# Altium PCB imu_proj_3.PcbDoc
Units mm, origin at the board's own origin, x right, y up, seen from the top; angles counter-clockwise.
Board outline 45.65 x 48 mm, 4 copper layers (Top Layer, GND1, GND2, Bottom Layer), stack 0.783 mm thick; 59 components, 46 nets, 248 pads, 82 vias.
Unrouted connection lines stored in the file: 17.
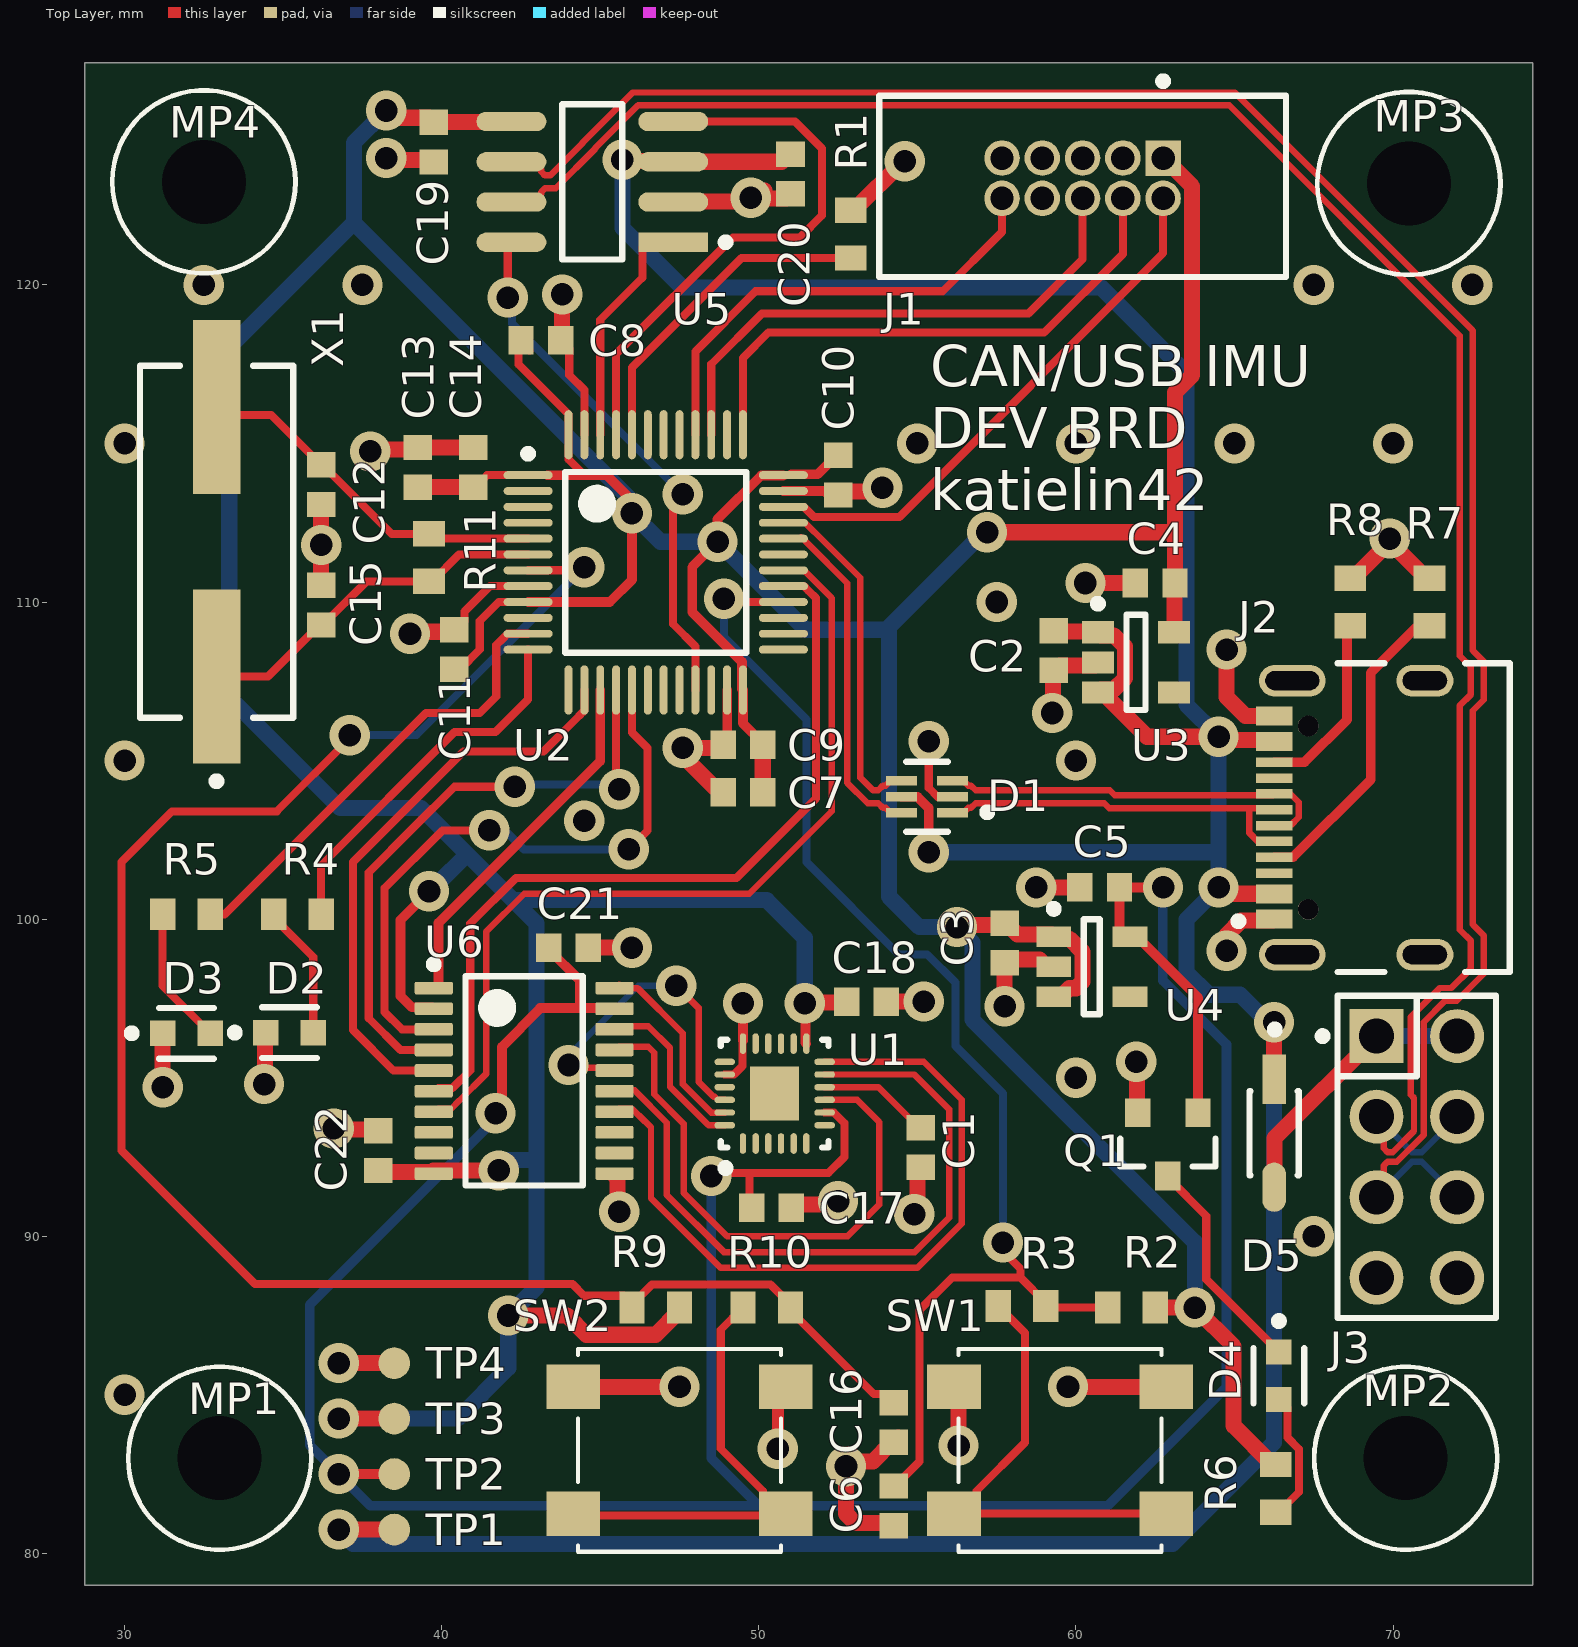
[diagram p0: Top Layer view]
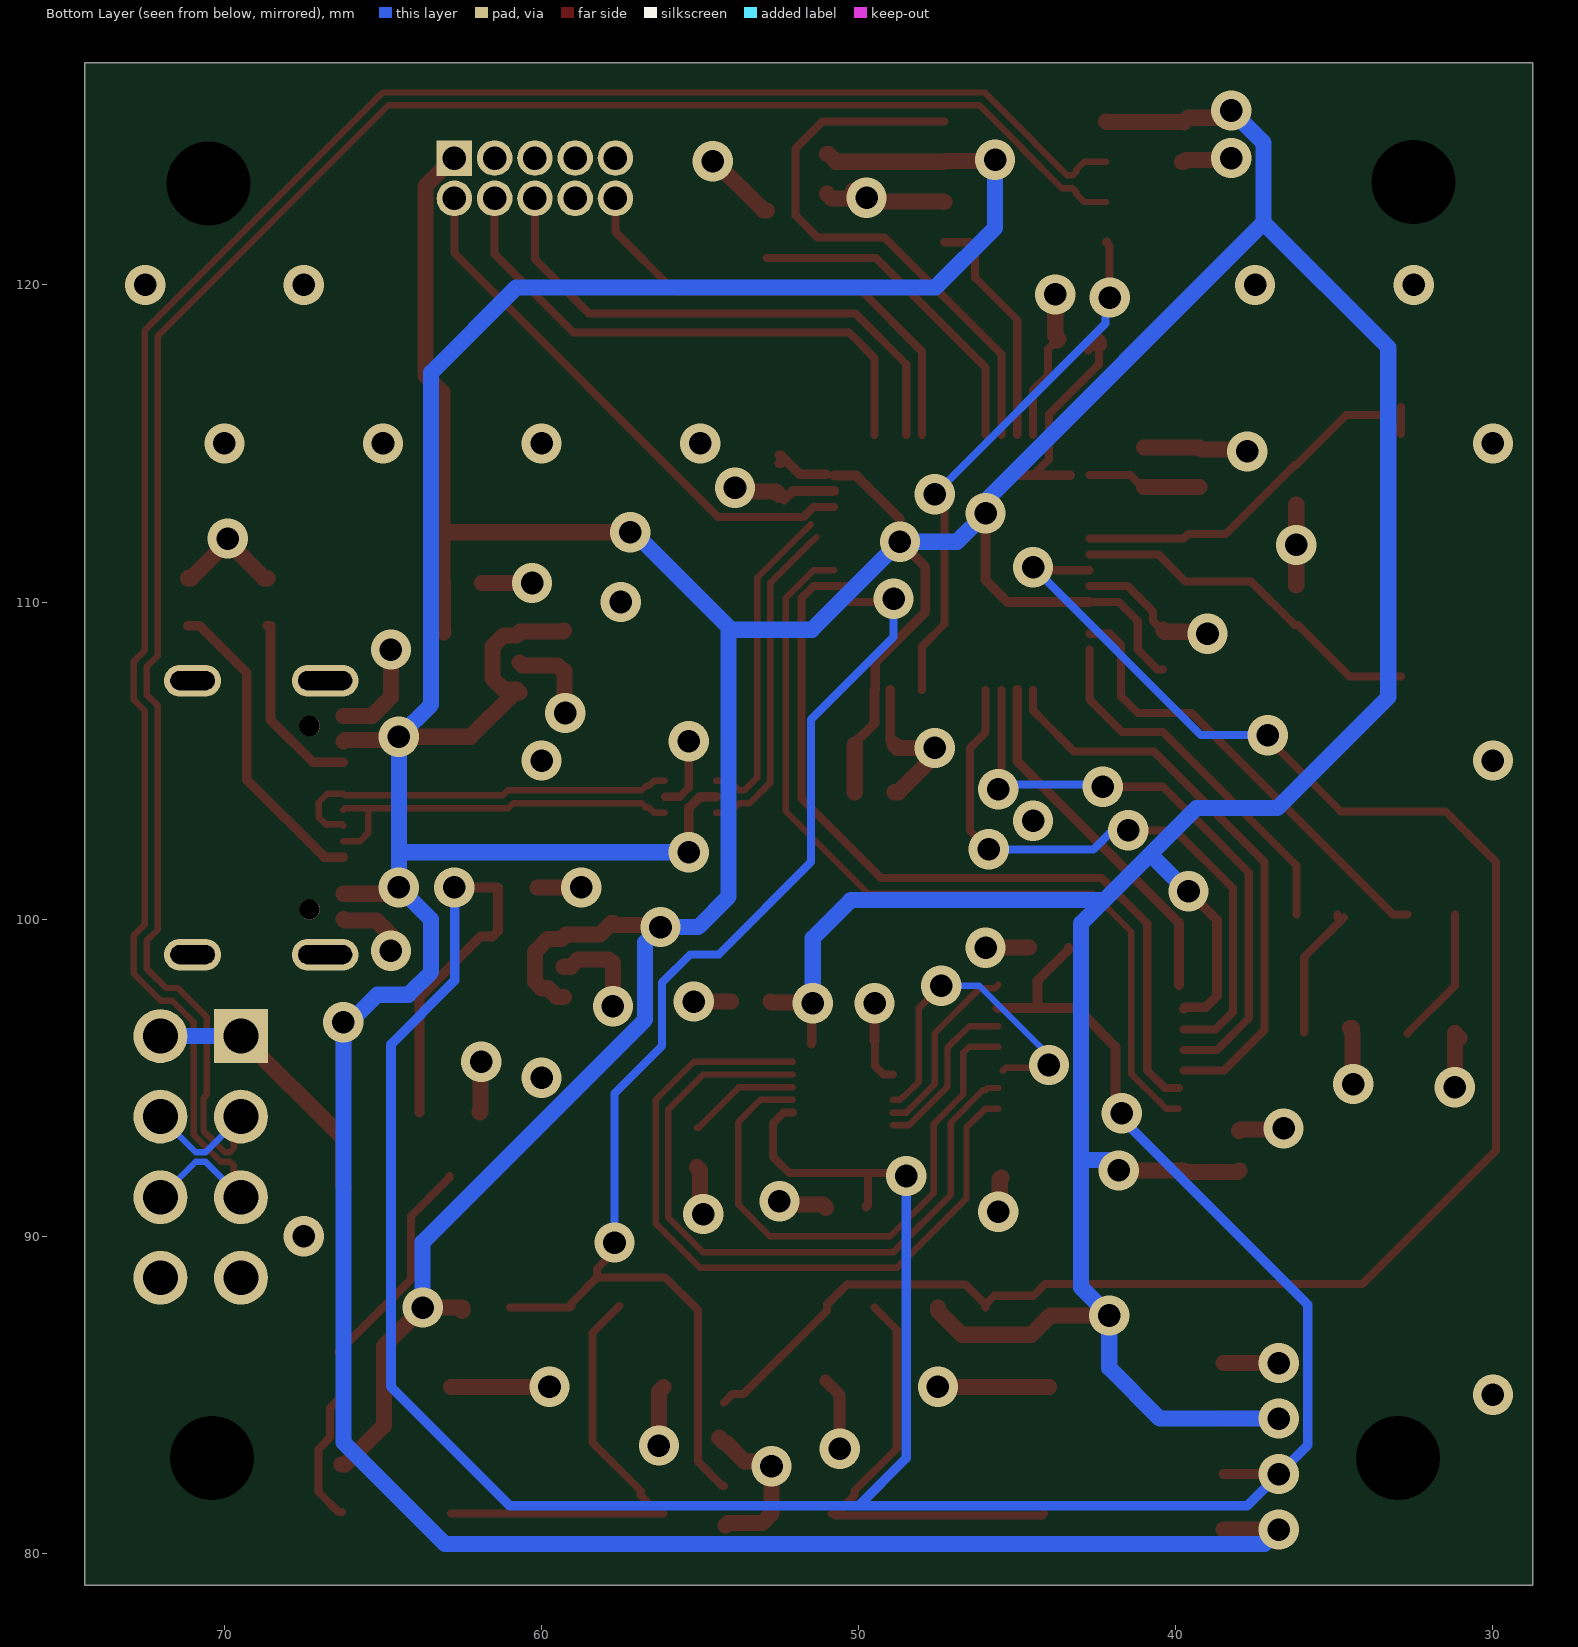
[diagram p1: Bottom Layer view, seen from below]
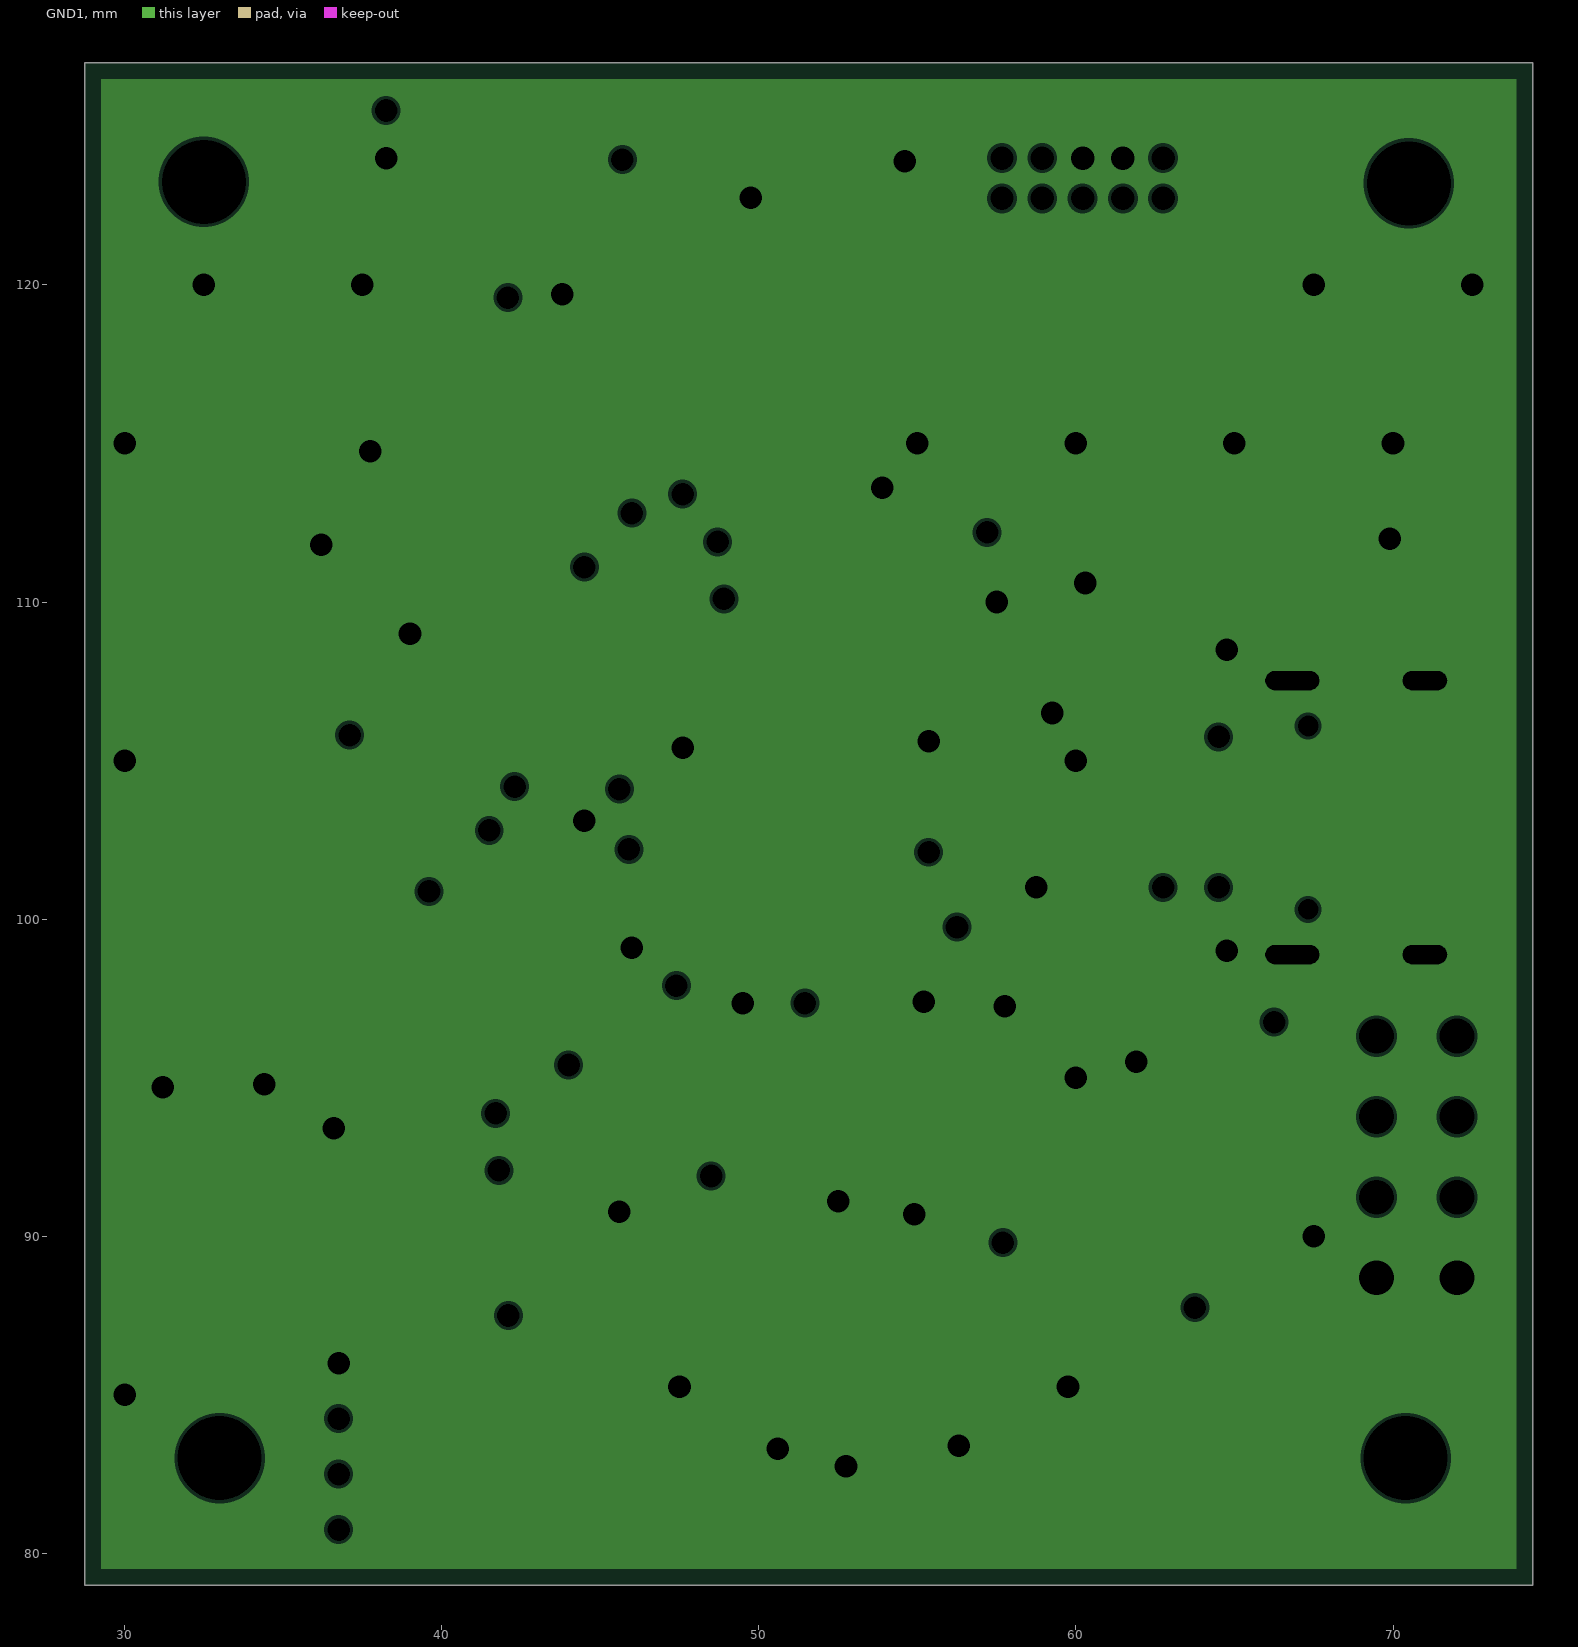
[diagram p2: GND1, clearances drawn from the general rule]
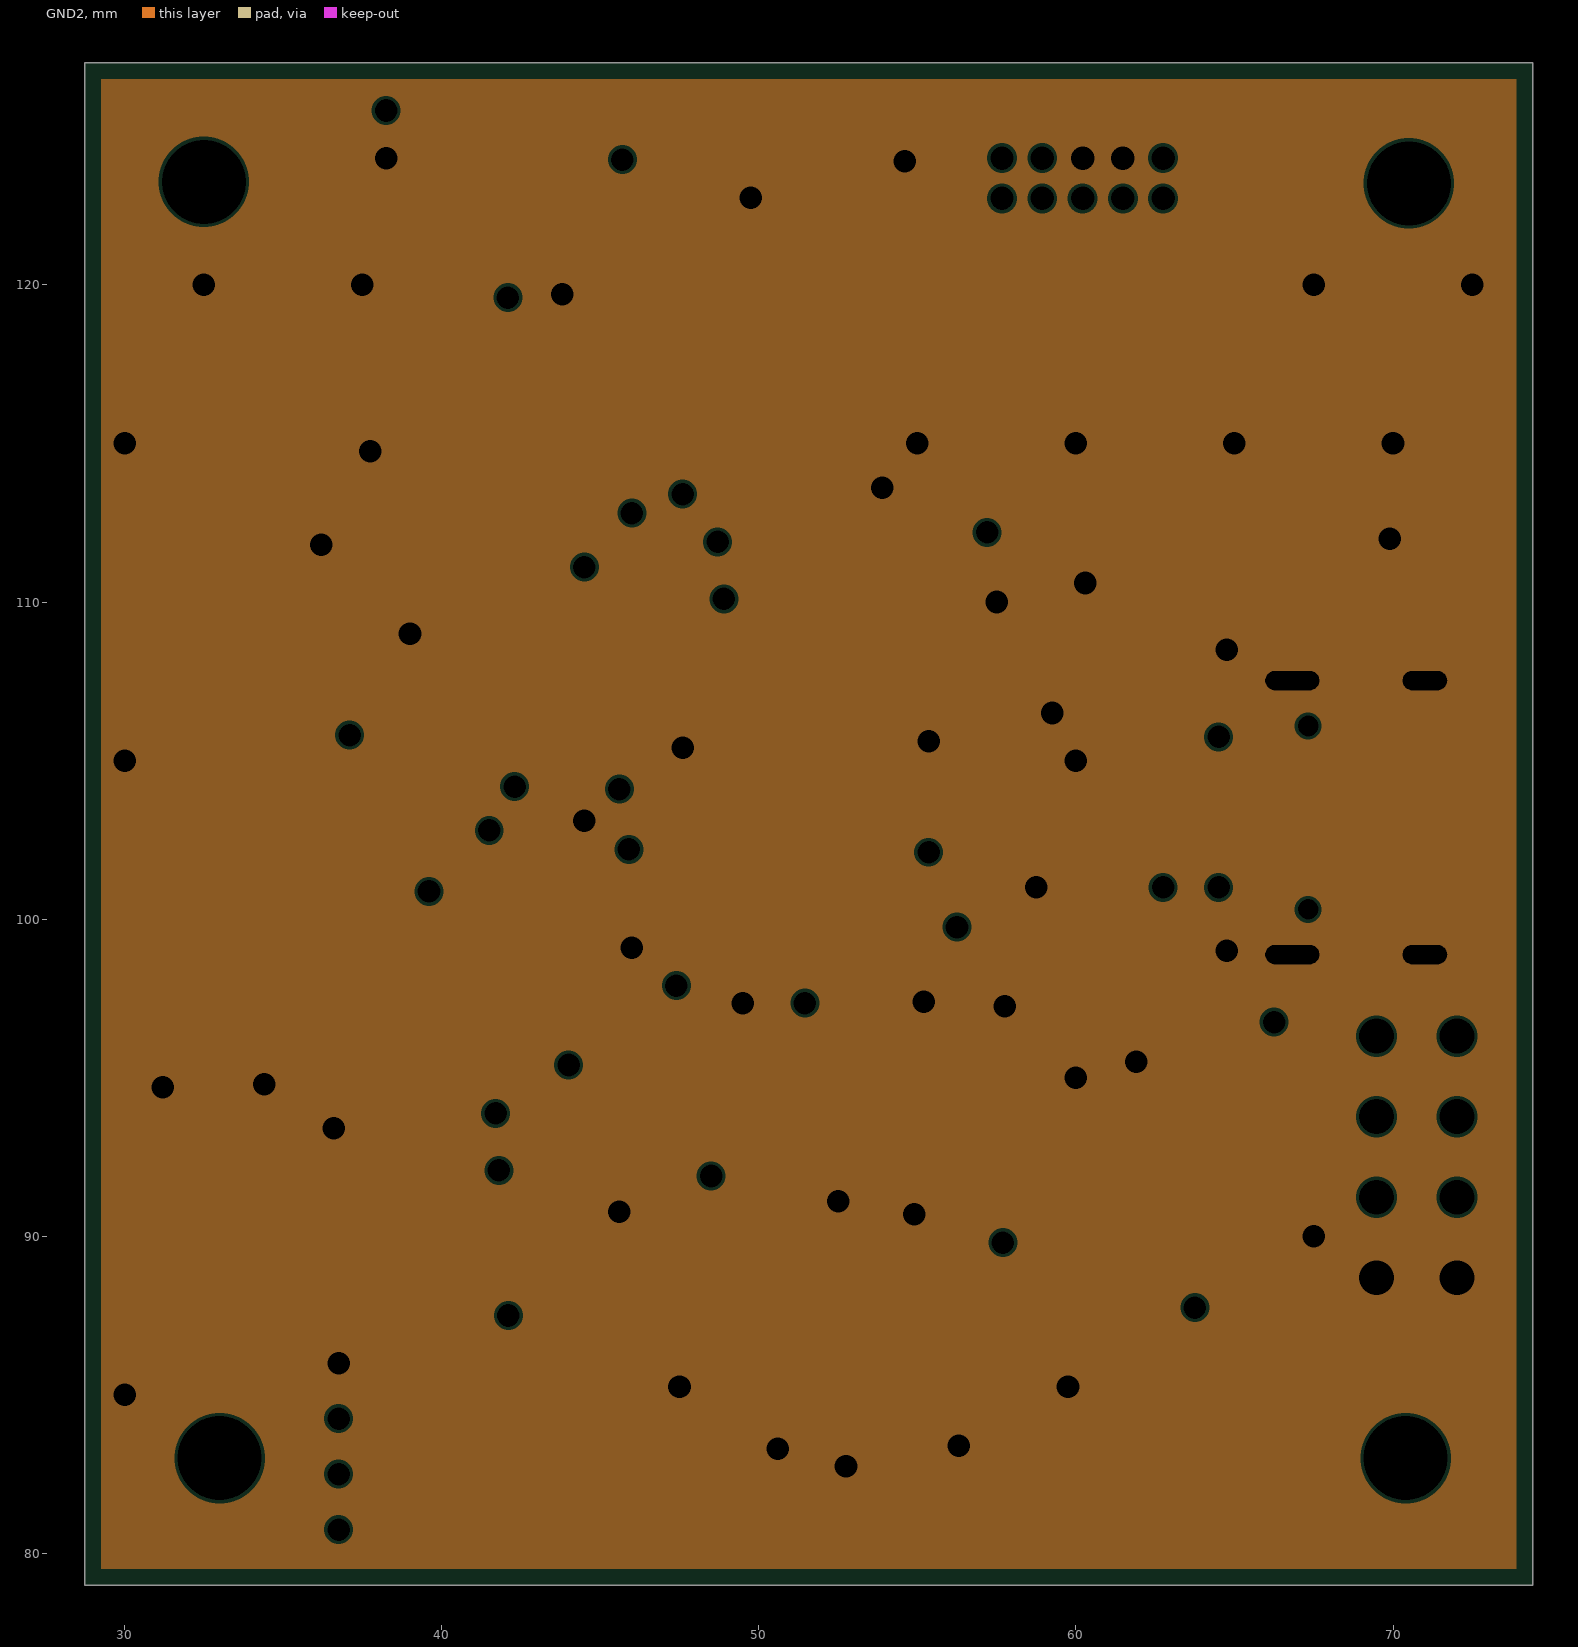
[diagram p3: GND2, clearances drawn from the general rule]

## Layer stack, top to bottom
Top Solder: solder mask 0.0102, Solder Resist, Dk 3.5
Top Layer: signal copper 0.0356
Dielectric 2: prepreg 0.0711, PP-006, Dk 4.1
GND1: plane copper 0.035, net GND
Dielectric 1: core 0.5, Core-009, Dk 4.5
GND2: plane copper 0.035, net GND
Dielectric 3: prepreg 0.0711, PP-006, Dk 4.1
Bottom Layer: signal copper 0.0356
Bottom Solder: solder mask 0.0102, Solder Resist, Dk 3.5

## Board outline
28.75,79 74.4,79 74.4,127 28.75,127

## Design rules (kind name [scope] priority, off if disabled: settings)
BoardOutlineClearance [All] p1: gap=0.2 ignorepadtopadclearanceinfootprint=FALSE
Clearance [All] p1: gap=0.102 ignorepadtopadclearanceinfootprint=TRUE except(0.127: Arc-Via Track-Via SMDPad-Via THPad-Via Via-Via Via-Fill Via-Poly Via-Region Via-Text; 0.25: Arc-Hole Track-Hole SMDPad-Hole THPad-Hole Via-Hole Fill-Hole Poly-Hole Region-Hole Text-Hole)
ComponentClearance [All] p1: gap=0.102 collisioncheckmode=3 verticalgap=0.102 showdistances=TRUE
DiffPairsRouting [All] p1: maxlimit=0.203 minlimit=0.102 mostfreqgap=0.203 toplayer_minwidth=0.102 toplayer_maxwidth=1816.048 toplayer_prefwidth=0.203 bottomlayer_maxgap=0.102 bottomlayer_prefgap=0.102 bottomlayer_minwidth=0.102 bottomlayer_maxwidth=1816.048 bottomlayer_prefwidth=0.102 maxuncoupledlength=12.7
Height [All] p1: minheight=0 maxheight=1816.048 prefheight=12.7
HoleSize [All] p1: absolutevalues=TRUE maxlimit=6.3 minlimit=0.2 maxpercent=80.000 minpercent=20.000
HoleToHoleClearance [All] p1: gap=0.25 allowstackedmicrovias=FALSE
MinimumAnnularRing [All] p1: minimumring=0.076
MinimumSolderMaskSliver [All] p1: minsoldermaskwidth=0
PlaneClearance [All] p1: clearance=0.102
PlaneConnect PlaneConnectPowerPads [InPadClass('PowerPads')] p1: planeconnectstyle=Direct reliefexpansion=0.508 reliefentries=4 reliefconductorwidth=0.254 reliefairgap=0.254
PlaneConnect [All] p2: pad.planeconnectstyle=Relief pad.reliefexpansion=0.3 pad.reliefentries=4 pad.reliefconductorwidth=0.102 pad.reliefairgap=0.102 via.planeconnectstyle=Direct via.reliefexpansion=0.3 via.reliefentries=4 via.reliefconductorwidth=0.127 via.reliefairgap=0.127
PolygonConnect PolygonConnectPowerPads [All vs (InPadClass('PowerPads'))] p1: connectstyle=Direct reliefconductorwidth=0.254 reliefentries=4 polygonreliefangle="90 Angle" airgapwidth=0.254
PolygonConnect [All] p2: thpad.connectstyle=Relief thpad.reliefconductorwidth=0.102 thpad.reliefentries=4 thpad.polygonreliefangle="90 Angle" thpad.airgapwidth=0.102 smdpad.connectstyle=Relief smdpad.reliefconductorwidth=0.102 smdpad.reliefentries=4 smdpad.polygonreliefangle="90 Angle" smdpad.airgapwidth=0.102 via.connectstyle=Direct via.reliefconductorwidth=0.127 via.reliefentries=4 via.polygonreliefangle="90 Angle" via.airgapwidth=0.127
RoutingVias [All] p1: holewidth=0.2 width=0.45 viastyle="Through Hole" minholewidth=0.2 minwidth=0.45 maxholewidth=6.3 maxwidth=6.55
SilkToSilkClearance [All] p1: silktosilkclearance=0
SilkToSolderMaskClearance [IsPad] p1: minsilkscreentomaskgap=0.102 clearancetoexposedcopper=TRUE
SolderMaskExpansion [All] p1: expansion=0.075
UnRoutedNet [All] p1: checkbadconnections=TRUE
Width [All] p1: maxlimit=1816.048 minlimit=0.102 preferedwidth=0.102
19 further rules are at their usual default settings.

## Components (designator, comment, footprint, x,y, rotation, side; value= is the part's Value field where it differs from the comment)
C1 "0.1µF" CAPC1608X87X35LL15T15 55.1,92.8 r90 top
C2 "1µF" CAPC1608X87X35LL15T15 59.296,108.471 r90 top
C3 "10µF" CAPC1608X87X35LL15T15 57.75,99.25 r90 top
C4 "1µF" CAPC1608X87X35LL15T15 62.5,110.6 r0 top
C5 "1µF" CAPC1608X87X35LL15T15 60.75,101 r0 top
C6 "0.1µF" CAPC1608X87X35LL15T15 54.25,81.5 r90 top
C7 "0.1µF" CAPC1608X87X35LL15T15 49.5,104 r0 top
C8 "0.1µF" CAPC1608X87X35LL15T15 43.125,118.25 r180 top
C9 "0.1µF" CAPC1608X87X35LL15T15 49.5,105.5 r0 top
C10 "0.1µF" CAPC1608X87X35LL15T15 52.5,114 r90 top
C11 "4.7µF" CAPC1608X87X35LL15T15 40.4,108.5 r270 top
C12 "20pF" CAPC1608X87X35LL15T15 36.2,113.7 r270 top
C13 "10nF" CAPC1608X87X35LL15T15 39.25,114.25 r270 top
C14 "1µF" CAPC1608X87X35LL15T15 41,114.25 r270 top
C15 "20pF" CAPC1608X87X35LL15T15 36.2,109.9 r90 top
C16 "0.1µF" CAPC1608X87X35LL15T15 54.25,84.125 r90 top
C17 "0.1µF" CAPC1608X87X35LL15T15 50.4,90.9 r0 top
C18 "0.1µF" CAPC1608X87X35LL15T15 53.4,97.4 r0 top
C19 "1µF" CAPC1608X87X35LL15T15 39.75,124.5 r90 top
C20 "1µF" CAPC1608X87X35LL15T15 51,123.5 r90 top
C21 "0.1µF" CAPC1608X87X35LL15T15 44,99.1 r0 top
C22 "0.1µF" CAPC1608X87X35LL15T15 38,92.7 r90 top
D1 "USBLC6-2P6" FP-SOT-666-MFG 55.304,103.859 r180 top
D2 "0603" FP-SML-LX0603SIW-TR-MFG 35.199,96.421 r0 top
D3 "0603" FP-SML-LX0603SIW-TR-MFG 31.95,96.4 r0 top
D4 "0603" FP-SML-LX0603SIW-TR-MFG 66.4,85.6 r270 top
D5 "1N5819" FP-SOD123-IPC_A 66.25,93.25 r270 top
J1 "SHF-105-01-L-D-TH" FP-SHF-105-01-L-D-TH-MFG 60.21,123.11 r180 top
J2 "USB4105-GF-A" FP-USB4105-GF-A-MFG 69.84,103.2 r90 top
J3 "PR20204VBDN" FP-PR20204VBDN-MFG 70.75,92.5 r270 top
MP1 "R25-1001302" FP-R25-1001302-MFG 33,83 r0 top
MP2 "R25-1001302" FP-R25-1001302-MFG 70.4,83 r0 top
MP3 "R25-1001302" FP-R25-1001302-MFG 70.5,123.2 r0 top
MP4 "R25-1001302" FP-R25-1001302-MFG 32.5,123.25 r0 top
Q1 "2N7002-7-F" FP-SOT23-MFG 62.9,92.9 r270 top
R1 "10k" RESC1608X55X25ML10T15 52.9,121.6 r90 top
R2 "10k" RESC1608X55X25ML10T15 61.75,87.75 r0 top
R3 "330R" RESC1608X55X25ML10T15 58.3,87.8 r0 top
R4 "1k" RESC1608X55X25ML10T15 35.45,100.15 r0 top
R5 "1k" RESC1608X55X25ML10T15 31.95,100.15 r0 top
R6 "1k" RESC1608X55X25ML10T15 66.3,82.05 r90 top
R7 "5.1k" RESC1608X55X25ML10T15 71.15,110 r270 top
R8 "5.1k" RESC1608X55X25ML10T15 68.65,110 r270 top
R9 "10k" RESC1608X55X25ML10T15 46.75,87.75 r0 top
R10 "330R" RESC1608X55X25ML10T15 50.25,87.75 r0 top
R11 "1M" RESC1608X55X25ML10T15 39.6,111.4 r90 top
SW1 "430473035826" 430473035826 59.5,83.25 r0 top
SW2 "430473035826" 430473035826 47.5,83.25 r0 top
TP1 "Test Point No BOM" tp_1mm_smd 38.5,80.75 r90 top value="TP SMD D1"
TP2 "Test Point No BOM" tp_1mm_smd 38.5,82.5 r90 top value="TP SMD D1"
TP3 "Test Point No BOM" tp_1mm_smd 38.5,84.25 r90 top value="TP SMD D1"
TP4 "Test Point No BOM" tp_1mm_smd 38.5,86 r90 top value="TP SMD D1"
U1 "ICM-20948" TDK-QFN-24_L 50.5,94.5 r90 top
U2 "STM32F103CBT6" STM-LQFP48_L 46.75,111.25 r0 top
U3 "NCP164CSN330T1G" ONSC-TSOP-5-483-02_V 61.896,108.096 r0 top
U4 "LD39015M15R" SOT23-5L_N 60.5,98.5 r0 top
U5 "TJA1042T/3/CM,118" FP-SOT96-1-IPC_A 44.75,123.25 r180 top
U6 "TXB0108PWR" PW0020A_L 42.6,94.9 r0 top
X1 "8M20P2" CTS-ATS-SM-XTAL-2 32.9,111.9 r90 top

## Footprints (in the part's own frame and the unit in brackets; to place one, negate y for a bottom-side part, rotate by r counter-clockwise, add the part's x,y. Pads: shape width x height; smd on the part's side, far side on the other; paste and mask are expansions set on the pad)
430473035826 [mm] "SMD Tact Switch, body 6x6mm"
  rect 1.7x1.4 smd: A1(-3.35,2) A2(3.35,2) B1(-3.35,-2) B2(3.35,-2)
  silkscreen extent -3.2,-3.2 3.2,3.2, body extent -3.6,-3.1 3.6,3.1, height 3.5
CAPC1608X87X35LL15T15 [mm] "Chip Capacitor, 2-Leads, Body 1.60x0.80mm, IPC High Density"
  rect 0.8x0.9 smd: 1(-0.625,0) 2(0.625,0)
  body extent -0.87,-0.48 0.87,0.48, height 0.87
CTS-ATS-SM-XTAL-2 [mm] "SMD, 2-Leads, Body 11.1x4.83mm, Pitch 8.5mm"
  rect 5.5x1.5 smd: 1(-4.25,0) 2(4.25,0)
  silkscreen extent -7.67,-2.41 5.55,2.41, body extent -5.59,-2.42 5.59,2.42, height 4.3
FP-PR20204VBDN-MFG [mm]
  rect 1.7x1.7 hole 1.1 paste-1000 mask+0: 1(-3.81,-1.27)
  round 1.7 hole 1.1 paste-1000 mask+0: 2(-3.81,1.27) 3(-1.27,-1.27) 4(-1.27,1.27) 5(1.27,-1.27) 6(1.27,1.27) 7(3.81,-1.27) 8(3.81,1.27)
  silkscreen extent -5.08,-3.09 5.08,2.5, body extent -5.18,-2.6 5.18,2.6, height 0.25
FP-R25-1001302-MFG [mm]
  round 0 hole 2.65 unplated paste-1000 mask-1000: ""(0,0)
  silkscreen extent -2.89,-2.88 2.89,2.88, body extent -2.99,-2.99 2.99,2.99, height 0.25
FP-SHF-105-01-L-D-TH-MFG [mm]
  rect 1.12x1.12 hole 0.74 paste-1000 mask+0: 1(-2.54,-0.89)
  round 1.12 hole 0.74 paste-1000 mask+0: 2(-2.54,0.38) 3(-1.27,-0.89) 4(-1.27,0.38) 5(0,-0.89) 6(0,0.38) 7(1.27,-0.89) 8(1.27,0.38) 9(2.54,-0.89) 10(2.54,0.38)
  silkscreen extent -6.42,-3.44 6.42,2.86, body extent -6.52,-2.96 6.52,2.96, height 0.25
FP-SML-LX0603SIW-TR-MFG [mm]
  rect 0.8x0.8 smd paste+0 mask+0: 1(-0.75,0) 2(0.75,0)
  silkscreen extent -1.85,-0.8 0.86,0.8, body extent -1.25,-0.56 1.25,0.56, height 0.25
FP-SOD123-IPC_A [mm]
  rect 1.557x0.742 smd paste+0 mask+0: 1(-1.7,0)
  rrect100% 1.557x0.742 smd paste+0 mask+0: 2(1.7,0)
  silkscreen extent -3.39,-0.77 1.33,0.77, body extent -2.98,-1.28 2.98,1.28, height 0.25
FP-SOT23-MFG [mm]
  rect 0.9x0.8 smd paste+0 mask+0: 1(-1,0.95) 2(-1,-0.95) 3(1,0)
  silkscreen extent -0.18,-1.5 0.7,1.5, body extent -1.55,-1.6 1.55,1.6, height 0.25
FP-SOT96-1-IPC_A [mm]
  rect 2.204x0.608 smd paste+0 mask+0: 1(-2.551,1.905)
  rrect100% 2.204x0.608 smd paste+0 mask+0: 2(-2.551,0.635) 3(-2.551,-0.635) 4(-2.551,-1.905) 5(2.551,-1.905) 6(2.551,-0.635) 7(2.551,0.635) 8(2.551,1.905)
  silkscreen extent -4.33,-2.45 0.95,2.45, body extent -4.15,-2.95 4.15,2.95, height 0.25
FP-SOT-666-MFG [mm]
  rect 0.99x0.3 smd paste+0 mask+0: 1(-0.805,0.5) 2(-0.805,0) 3(-0.805,-0.5) 4(0.805,-0.5) 5(0.805,0) 6(0.805,0.5)
  silkscreen extent -2.02,-1.1 0.65,1.1, body extent -1.4,-0.95 1.4,0.95, height 0.25
FP-USB4105-GF-A-MFG [mm]
  rrect100% 1x2.1 hole 1.7 slot 0.6 at 0 deg paste-1000 mask+0: 1(-4.32,3.015) 2(4.32,3.015)
  rrect100% 1x1.8 hole 1.4 slot 0.6 at 0 deg paste-1000 mask+0: 3(-4.32,-1.165) 4(4.32,-1.165)
  rect 0.6x1.15 smd paste+0 mask+0: A1-B12(-3.2,3.59) A4-B9(-2.4,3.59) B1-A12(3.2,3.59) B4-A9(2.4,3.59)
  rect 0.3x1.15 smd paste+0 mask+0: A5(-1.25,3.59) A6(-0.25,3.59) A7(0.25,3.59) A8(1.25,3.59) B5(1.75,3.59) B6(0.75,3.59) B7(-0.75,3.59) B8(-1.75,3.59)
  round 0.65 hole 0.65 unplated paste-1000 mask+0: ""(-2.89,2.515) ""(2.89,2.515)
  silkscreen extent -4.86,-3.84 4.86,4.84, body extent -4.96,-3.94 4.96,4.27, height 0.25
ONSC-TSOP-5-483-02_V [mm] "SOP, 5-Leads, Body 3x1.5mm, Pitch 0.95mm"
  rect 1x0.7 smd: 1(-1.2,0.95) 2(-1.2,0) 3(-1.2,-0.95) 4(1.2,-0.95) 5(1.2,0.95)
  silkscreen extent -1.32,-1.5 0.3,1.97, body extent -0.75,-1.5 0.75,1.5, height 1.1
PW0020A_L [mm] "SOP, 20-Leads, Body 6.6x4.5mm, Pitch 0.65mm, IPC High Density"
  rrect25% 1.2x0.4 smd: 1(-2.85,2.925) 2(-2.85,2.275) 3(-2.85,1.625) 4(-2.85,0.975) 5(-2.85,0.325) 6(-2.85,-0.325) 7(-2.85,-0.975) 8(-2.85,-1.625) 9(-2.85,-2.275) 10(-2.85,-2.925) 11(2.85,-2.925) 12(2.85,-2.275) 13(2.85,-1.625) 14(2.85,-0.975) 15(2.85,-0.325) 16(2.85,0.325) 17(2.85,0.975) 18(2.85,1.625) 19(2.85,2.275) 20(2.85,2.925)
  silkscreen extent -2.97,-3.3 1.85,3.8, body extent -3.21,-3.25 3.21,3.25, height 1
RESC1608X55X25ML10T15 [mm] "Chip Resistor, 2-Leads, Body 1.60x0.80mm, IPC Low Density"
  rect 0.8x1 smd: 1(-0.75,0) 2(0.75,0)
  body extent -0.85,-0.45 0.85,0.45, height 0.55
SOT23-5L_N [mm] "SOT23, 5-Leads, Body 2.9x1.6mm, Pitch 0.95mm, Lead Span 2.8mm, IPC Medium Density"
  rect 1.1x0.65 smd: 1(-1.2,0.95) 2(-1.2,0) 3(-1.2,-0.95) 4(1.2,-0.95) 5(1.2,0.95)
  silkscreen extent -1.32,-1.5 0.25,1.95, body extent -0.87,-1.5 0.87,1.5, height 1.45
STM-LQFP48_L [mm] "QFP, 48-Leads, Body 7x7mm, Pitch 0.5mm, IPC High Density"
  oval 1.55x0.25 smd: 1(-4.025,2.75) 2(-4.025,2.25) 3(-4.025,1.75) 4(-4.025,1.25) 5(-4.025,0.75) 6(-4.025,0.25) 7(-4.025,-0.25) 8(-4.025,-0.75) 9(-4.025,-1.25) 10(-4.025,-1.75) 11(-4.025,-2.25) 12(-4.025,-2.75) 25(4.025,-2.75) 26(4.025,-2.25) 27(4.025,-1.75) 28(4.025,-1.25) 29(4.025,-0.75) 30(4.025,-0.25) 31(4.025,0.25) 32(4.025,0.75) 33(4.025,1.25) 34(4.025,1.75) 35(4.025,2.25) 36(4.025,2.75)
  oval 0.25x1.55 smd: 13(-2.75,-4.025) 14(-2.25,-4.025) 15(-1.75,-4.025) 16(-1.25,-4.025) 17(-0.75,-4.025) 18(-0.25,-4.025) 19(0.25,-4.025) 20(0.75,-4.025) 21(1.25,-4.025) 22(1.75,-4.025) 23(2.25,-4.025) 24(2.75,-4.025) 37(2.75,4.025) 38(2.25,4.025) 39(1.75,4.025) 40(1.25,4.025) 41(0.75,4.025) 42(0.25,4.025) 43(-0.25,4.025) 44(-0.75,4.025) 45(-1.25,4.025) 46(-1.75,4.025) 47(-2.25,4.025) 48(-2.75,4.025)
  silkscreen extent -4.15,-2.85 2.85,3.55, body extent -3.5,-3.5 3.5,3.5, height 1.6
TDK-QFN-24_L [mm] "QFN, 24-Leads, Body 3.10x3.10mm, Pitch 0.40mm, Thermal Pad 1.70x1.54mm, IPC High Density"
  oval 0.65x0.2 smd: 1(-1.575,1) 2(-1.575,0.6) 3(-1.575,0.2) 4(-1.575,-0.2) 5(-1.575,-0.6) 6(-1.575,-1) 13(1.575,-1) 14(1.575,-0.6) 15(1.575,-0.2) 16(1.575,0.2) 17(1.575,0.6) 18(1.575,1)
  oval 0.2x0.65 smd: 7(-1,-1.575) 8(-0.6,-1.575) 9(-0.2,-1.575) 10(0.2,-1.575) 11(0.6,-1.575) 12(1,-1.575) 19(1,1.575) 20(0.6,1.575) 21(0.2,1.575) 22(-0.2,1.575) 23(-0.6,1.575) 24(-1,1.575)
  rect 1.7x1.54 smd: 25(0,0)
  silkscreen extent -2.47,-1.7 1.7,1.7, body extent -1.55,-1.55 1.55,1.55, height 1.05
tp_1mm_smd [mm]
  round 1 smd paste-1: 1(0,0)

## Part data
C1 C2 C3 C4 C5 C6 C7 C8 C9 C10 C11 C12 C13 C14 C15 C16 C17 C18 C19 C20 C21 C22: library part CMP-2006-03741-1, Manufacturer=Kemet, Part Number=C0603S102K5RACTU
D1: library part CMP-12225-000058-1, "TVS DIODE 5.25V 17V SOT666", Breakdown Voltage=6V, Capacitance=3.5pF, Case/Package=SOT-666, Clamping Voltage=17V, Leakage Current=150nA, Max Operating Temperature=125°C, Min Operating Temperature=-40°C, Operating Supply Voltage=5V, Package Quantity=1, Peak Pulse Current=5A, Power Line Protection=Yes, Test Current=1mA, Contact Plating=Tin, Depth=1.3mm, Direction=Unidirectional, Element Configuration=Dual, ESD Protection=Yes, Height=0.6mm, Lead Free="Lead Free", Length=1.7mm, Max Breakdown Voltage=6V, Max Reverse Leakage Current=150nA, Min Breakdown Voltage=6V, Mount="Surface Mount", Number of Bidirectional Channels=2, Number of Channels=2, Number of Elements=1, Number of Pins=6, Packaging="Tape and Reel", Polarity=Unidirectional, Radiation Hardening=No, REACH SVHC="No SVHC", Reverse Breakdown Voltage=6V, Reverse Standoff Voltage=5V, Termination=SMD/SMT, Width=1.3mm, Working Voltage=5V
D2 D3 D4: library part CMP-57192-000009-1, "LED RED DIFFUSED SMD", Case Code (Metric)=1608, Color=Red, Forward Current=20mA, Forward Voltage=2V, Lens Color=White, Max Operating Temperature=85°C, Min Operating Temperature=-25°C, Package Quantity=1, Power Rating=50mW, Approvals=UL, Case/Package=0603, Case Code (Imperial)=0603, Dominant Wavelength=636nm, Height=0.6mm, Illumination Color=Red, Lead Free="Lead Free", Length=1.6mm, Lens Style=Diffused, Lens Transparency=Diffused, Luminous Intensity=60mcd, Moisture Sensitivity Level=2, Mount="Surface Mount", Number of LEDs=1, Number of Pins=2, Packaging="Tape and Reel", REACH SVHC="No SVHC", RoHS Compliant=Yes, Test Current=20mA, Viewing Angle=140°, Wavelength=636nm, Width=0.8mm
D5: library part CMP-0303-00003-3, "DIODE SCHOTTKY 40V 1A SOD123", Average Rectified Current=1A, Capacitance=110pF, Case/Package=SOD-123-2, Forward Voltage=450mV, Max Forward Surge Current (Ifsm)=25A, Max Operating Temperature=125°C, Max Power Dissipation=450mW, Max Repetitive Reverse Voltage (Vrrm)=40V, Min Operating Temperature=-65°C, Package Quantity=3000, Peak Reverse Current=50uA, Contact Plating=Tin, Current Rating=1A, Element Configuration=Single, Forward Current=1A, Height=1.25mm, Lead Free="Lead Free", Length=2.85mm, Max Reverse Voltage (DC)=40V, Number of Pins=2, Output Current=1A, Packaging="Tape and Reel", Peak Non-Repetitive Surge Current=25A, Polarity=Standard, Radiation Hardening=No, REACH SVHC="No SVHC", Termination=SMD/SMT, Voltage Rating (DC)=40V, Weight=0.000353oz, Width=1.7mm
J1: library part CMP-02766-000059-1, "CONN HEADER VERT 10POS 1.27MM", Manufacturer=Samtec, Package=0, Temperature="-55°C to +125°C", Temperature Range High=+125°C, Temperature Range Low=-55°C, Automotive=No, Category=Conn, ComponentLink2Description=Datasheet, ComponentLink2URL=http://suddendocs.samtec.com/prints/shf-1xx-01-x-d-xx-xx-mkt.pdf, Conn Gender=Male, Conn Orientation=Vertical, Contact Material=Gold,Nickel, Device Class L1=Connectors, Device Class L2="Headers and Wire Housings", Device Class L3=unset, Digikey Description="CONN HEADER VERT 10POS 1.27MM", Footprint Url=http://suddendocs.samtec.com/prints/shf-1xx-01-x-d-xx-xx-footprint.pdf, Height=5.46mm, Lead Free=Yes, Manufacturer Part Number=SHF-105-01-L-D-TH, Mouser Description="Conn Shrouded Header (4 Sides) HDR 10 POS 1.27mm Solder ST Thru-Hole Tube", Number Of Contacts=10, Number Of Rows=2, Octopart=https://octopart.com/shf-105-01-l-d-th-samtec-17904677, Pitch=1.27mm, RoHS=TRUE, Standoff Height=0.38mm
J2: library part CMP-245163-000001-1, "CONN RCPT USB2.0 TYPEC 5A", Current Rating=5/6.25/1.25/0.25A, Manufacturer=GCT, Package=0, Temperature="-40°C to +85°C", Temperature Range High=+85°C, Temperature Range Low=-40°C, Voltage Rating=20V, Automotive=No, Category=Conn, ComponentLink2Description=Datasheet, ComponentLink2URL=https://gct.co/files/drawings/usb4105.pdf, Conn Orientation="Right Angle", Contact Material=Gold,Nickel, Device Class L1=Connectors, Device Class L2="USB Connectors", Device Class L3=unset, Digikey Description="CONN RCPT USB2.0 TYPEC 5A", Height=3.46mm, Is Female=yes, Lead Free=Yes, Manufacturer Part Number=USB4105-GF-A, Number Of Contacts=16, Octopart=https://octopart.com/usb4105-gf-a-gct-106627878, RoHS=TRUE, Usb Standard="USB 2.0"
J3: library part CMP-77940-000004-1, "PIN HEADER, THR, DUAL ROW, .100\""
MP1 MP2 MP3 MP4: library part CMP-15845-000001-1, "HEX STNDFF M2.5X0.45 BRASS 13MM", Color=Silver, Package Quantity=200, Gender="Female, Female", Length=0.512inch, Material=Brass, Outside Diameter=0.217inch, Plating=Nickel, Series=R25-100, Threaded/Unthreaded=Threaded, Thread Size=M2.5
Q1: library part CMP-2000-04929-2, "MOSFET N-CH 60V 115MA SOT23-3", Case/Package=SOT-23, Continuous Drain Current (ID)=115mA, Drain to Source Breakdown Voltage=70V, Drain to Source Resistance=7.5R, Drain to Source Voltage (Vdss)=60V, Gate to Source Voltage (Vgs)=20V, Input Capacitance=50pF, Max Operating Temperature=150°C, Max Power Dissipation=300mW, Min Operating Temperature=-55°C, Package Quantity=3000, Power Dissipation=540mW, Threshold Voltage=2.5V, Contact Plating=Tin, Current Rating=115mA, Dual Supply Voltage=60V, Element Configuration=Single, Fall Time=5.6ns, Height=1mm, Lead Free="Lead Free", Length=2.9mm, Mount="Surface Mount", Nominal Vgs=2.5V, Number of Channels=1, Number of Elements=1, Number of Pins=3, On-State Resistance=7.5R, Packaging="Tape and Reel", Radiation Hardening=No, Rds On Max=7.5R, REACH SVHC="No SVHC", Rise Time=3ns, Termination=SMD/SMT, Turn-Off Delay Time=11ns, Turn-On Delay Time=7ns, VOLTAGE=60V, Voltage Rating (DC)=60V, Weight=0.000282oz, Width=1.3mm
R1 R2 R3 R4 R5 R6 R7 R8 R9 R10 R11: library part CMP-2000-04177-1, Manufacturer=Yageo, Part Number=RC0603FR-1020KL
SW1 SW2: library part CMP-1455-00006-5, "Switch Tactile Spst-no 0.05A 12V", Current Rating=50mA, Insulation Resistance=100MO, Max Operating Temperature=85°C, Min Operating Temperature=-40°C, Voltage Rating=12V, Actuator Material="Liquid Crystal Polymer, Polymer", Contact Plating=Silver, Height=3.5mm, Illumination Type=Non-Illuminated, Mechanical Life=500kcycles, Mount="Surface Mount", Packaging="Tape and Reel", RoHS=Compliant, Switch Function=Off-Mom, Switch Travel=250µm, Throw Configuration=SPST
TP1 TP2 TP3 TP4: library part CON1759, "Test Point", Assembly Type=SMD, Category=Connector, ComponentLink1Description="SVN Datasheet", ComponentLink2Description="Local Datasheet", ComponentLink3Description="Open Symbol", ComponentLink3URL="C:\ALTIUM_WORK\00001_MCHP-CDB\Library\LibraryRefs\Test Point No BOM.SchLib", ComponentLink4Description="Open Footprint", ComponentLink4URL=C:\ALTIUM_WORK\00001_MCHP-CDB\Library\Footprints\TP_1mm_SMD.PcbLib, ComponentLink5Description="Open Footprint 2", ComponentLink6Description="Open Footprint 3", ComponentLink7Description="Open Footprint 4", Description_="CON TP PAD PCB SMD D1", Dev Tools Status=Production, MCHP-ID=CON1759, Owner="Cristian Papuc", Populated=YES, Quantity Override=1, Restricted Sourcing=No, Revision=1, Status="MCL Design", Symbol="Test Point No BOM", Type="Test Point No BOM"
U1: library part CMP-2000-07532-1, "World’s Lowest Power 9-Axis MEMS MotionTracking(TM) Device, 1.71 to 3.6 V, -40 to 85 degC, 24-Pin QFN, RoHS, Tape and Reel", Manufacturer=TDK, Package Description="24-Pin Quad Flat No-lead Package, Body 3 x 3 mm, Pitch 0.4 mm", Package Reference=QFN-24, Datasheet URL=https://www.invensense.com/wp-content/uploads/2016/06/DS-000189-ICM-20948-v1.3.pdf, Datasheet Version="Rev. 1.3, 06/2017", Manufacturer URL=http://www.tdk.com/, Mounting Technology=SurfaceMount
U2: library part CMP-0237-00250-3, "ARM Cortex-M3 32-bit MCU, 128 KB Flash, 20 KB Internal RAM, 37 I/Os, 48-pin LQFP, -40 to 85 degC, Tray", I/Os (High Current)=37, Operating Frequency(F) (Processor speed) (MHz)=72, Supply Voltage(Vcc) min (V)=2, A/D Converter="2x12-bit (10 Channel)", ComponentLink1Description="Manufacturer URL", ComponentLink1URL=http://www.st.com/web/en/home.html, ComponentLink2Description=Datasheet, ComponentLink2URL=http://www.st.com/st-web-ui/static/active/en/resource/technical/document/datasheet/CD00161566.pdf, ComponentLink3Description="Package Specification", ComponentLink3URL=http://www.st.com/st-web-ui/static/active/en/resource/technical/document/datasheet/DM00058181.pdf, Core="ARM Cortex-M3", DatasheetVersion="Rev. 16", FLASH Size (Prog) (kB)=128, Internal RAM Size (kB)=20, Mounting Technology="Surface Mount", PackageDescription="48-Pin Low Profile Quad Flat Package, 7 x 7 mm Body, 0.5 mm Pitch", PackageReference=LQFP48, PackageVersion="Rev. 6, 06/2013", Packing=Tray, PartNumber=STM32F103CBT6
U3: library part CMP-1063-00221-1, "Bi-Directional Quad TVS Array, 5-Pin TSOP, Pb-Free, Tape and Reel", Manufacturer="On Semiconductor", PartNumber=NUP4004M5T1G, ComponentLink1Description="Manufacturer URL", ComponentLink1URL=http://www.onsemi.com/, ComponentLink2Description=Datasheet, ComponentLink2URL=http://www.onsemi.cn/pub_link/Collateral/NUP4004M5-D.PDF, ComponentLink3Description="Package Specification", ComponentLink3URL=http://www.onsemi.com/pub_link/Collateral/483.PDF, DatasheetVersion="Rev. 2", Direction=Bidirectional, IR Max (uA)=1, Mounting Technology="Surface Mount", Number of Lines=4, PackageDescription="5-Pin Small Outline Package, Body 3 x 1.5 mm, Pitch 0.95 mm", PackageReference=TSOP-5-483-02, PackageVersion="Rev. K, 04/2013", Packing="Tape and Reel", RoHS=Pb-Free, VRWM Max (V)=5
U4: library part CMP-0244-00342-1, "150 mA Low Quiescent Current Low Noise Voltage Regulator, 1.5V, 5-Pin SOT-23, Tape and Reel", ComponentLink1Description="Manufacturer URL", ComponentLink1URL=http://www.st.com, ComponentLink2Description=Datasheet, ComponentLink2URL=http://www.st.com/internet/com/TECHNICAL_RESOURCES/TECHNICAL_LITERATURE/DATASHEET/CD00173477.pdf, DatasheetVersion=1/02/2009, PackageDescription="5-Pin SOT-23 Package, 2.9 x 1.6 mm Body, 0.95 mm Pitch, 2.8 mm Lead Span", PackageReference=SOT23-5L, PackageVersion=1/01/2008
U5: library part CMP-10098-000021-1, "IC TRANSCEIVER HALF 1/1 8SO", Case/Package=SO, Max Operating Temperature=150°C, Max Supply Current=70mA, Max Supply Voltage=5.5V, Min Operating Temperature=-40°C, Min Supply Voltage=4.5V, Operating Supply Voltage=5V, Package Quantity=2500, Contact Plating=Gold, Data Rate=1Mbps, Lead Free="Lead Free", Mount="Surface Mount", Nominal Supply Current=70mA, Number of Pins=8, Number of Transceivers=1, Packaging="Tape and Reel", Radiation Hardening=No
U6: library part CMP-2000-07337-1, "TXB0108 8-Bit Bidirectional Voltage-Level Translator with Auto-Direction Sensing and / +/- 15-kV ESD Protection, 1.2 to 3.6 V, -40 to 85 degC, 20-Pin TSSOP (PW), Green (RoHS & no Sb/Br), Tape and Reel", Manufacturer="Texas Instruments", Operating Temperature=-40°C~85°C, Package / Case="20-TSSOP(0.173\",4.40mmWidth)", Package Description="20-Pin Small Outline Package Integrated Circuit, Body 6.5 x 4.4 mm, Pitch 0.65 mm", Package Reference=PW20, Package Version="4040064-5/G, 02/2011", Standard Package=1, Supplier Device Package=20-TSSOP, Voltage - Supply=1.2V~3.6V,1.65V~5.5V, Category=IntegratedCircuits(ICs), Data Rate=100Mbps, Datasheet URL=http://www.ti.com/general/docs/lit/getliterature.tsp?genericPartNumber=TXB0108&fileType=pdf, Datasheet Version="Rev. F, 12/2014", Differential - Input=Output:No/No, Dynamic Catalog=TXBSeries, Family=Logic-Translators, Input Type=Logic, Logic Function=Translator,Bidirectional, Manufacturer URL=http://www.ti.com/, Mounting Technology=SurfaceMount, Number of Bits=8, Number of Channels=8, Number of Outputs/Channel=1, Other Names=296-21527-6, Output Type=Logic, Package URL=http://www.ti.com/litv/pdf/mpds362, Packaging=Digi-Reel®, Product Training Modules=VoltageLevelTranslation, Propagation Delay (Max)=4ns, Series=-
X1: library part CMP-0585-00002-2, "ATS-SM Series Quartz Crystal, 16 MHz, -20 to 70 degC, 11.1 x 4.83 x 4.3mm SMD, RoHS, Tape and Reel", Frequency="16 MHz", Manufacturer="CTS Corporation", Operating Temperature="-20 to 70 degC", PartNumber=ATS16ASM-1, Shunt Capacitance (C0)="7.0 pF Max", ComponentLink1Description="Manufacturer URL", ComponentLink1URL=http://www.ctscorp.com/, ComponentLink2Description=Datasheet, ComponentLink2URL=http://www.ctscorp.com/components/Datasheets/008-0309-0.pdf, ComponentLink3Description="Package Specification", ComponentLink3URL=http://www.ctscorp.com/components/Datasheets/008-0309-0.pdf, Crystal Cut=AT-Cut, DatasheetVersion="Rev. K", Drive Level (Type)="100 uW", ESR Maximum="40 Ohms", Mounting Technology="Surface Mount", Oscillation Mode="Fundamental or 3rd Overtone", PackageDescription="2-Pin SMD, Body 11.1 x 4.83 mm, Pitch 8.5 mm", PackageReference=ATS-SM-XTAL-2, Packing="Tape and Reel", RoHS=TRUE

## Via types
v1: diameter 1.27, hole 0.711, Top Layer to Bottom Layer, 82 vias

## Nets (pads, with @x,y where several pads share a name; then routed paths per layer and width w, separated by ;. In a path a pad name is that pad's centre, name@x,y a point inside that pad or via, vN(x,y) a via of type N, cw(c..) or ccw(c..) an arc to the next point about the centre after c; other vN are vias at no path point)
1V8: C5.2 C17.1 C21.1 Q1.1 TP2.1 U1.8 U4.5 U6.19 | length 99.4
  Top Layer w0.254: v1(48.5,91.9) 48.6,92 49.712,92 ; C17.1@49.775,90.95 C17.1 49.712,90.963 49.712,92 ; U1.8 52.365,93.9 52.7,93.565 52.7,92.5 52.2,92 49.712,92
  Top Layer w0.305: v1(36.75,82.5) TP2.1 ; v1(41.7,93.875) 41.9,94.075 41.9,95.975 43.1,97.175 43.1,97.2 44.363,97.2 ; C21.1 43.375,99.05 44.363,98.062 44.363,97.2 ; U6.19@45.625,97.2 44.363,97.2 ; v1(62.75,101) C5.2 61.375,99.623 61.548,99.45 U4.5 61.925,99.45 63.85,97.525 Q1.1
  Bottom Layer w0.305: v1@41.8,93.8 35.836,87.836 35.836,83.414 v1(36.75,82.5) 37.75,81.5 50,81.5 ; v1(48.5,91.9) 48.5,83 50,81.5 ; v1(62.75,101) 62.742,100.992 62.742,98.058 64.75,96.05 64.75,85.25 61,81.5 50,81.5
3V3: C3.2 C4.2 C7.2 C8.2 C9.2 C10.2 C11.2 C13.2 C14.2 C18.1 C19.2 C22.1 J1.1 R2.2 R6.2 R9.2 TP3.1 U1.13 U2.1 U2.9 U2.24 U2.36 U2.48 U3.5 U4.1 U4.3 U5.5 U6.2 U6.10 | length 215.3
  Top Layer w0.254: C11.2 40.575,107.875 41.2,108.5 41.2,109.4 41.8,110 U2.9 ; C14.2 41.05,113.625 41.425,114 U2.1 ; C8.2@42.425,118.175 42.425,118.125 42.425,117.496 44,115.921 U2.48 44,114.5 44.5,114 ; C8.2@42.5,118.2 C8.2@42.773,117.927
  Top Layer w0.305: v1(39.6,100.875) 38.7,99.975 38.7,97.575 39.052,97.223 39.702,97.223 U6.2 ; U2.9 45.3,110 46,110.7 v1(46,112.8) 46,113.2 45.2,114 44.5,114 U2.1@43.325,114 ; C9.2 50.125,105.55 49.5,106.175 U2.24 49.473,107.252 49.473,108.114 47.9,109.686 47.9,111.1 v1(48.7,111.9) 48.7,112.611 50.078,113.989 U2.36@50.775,113.989 ; U2.36@51.021,114.027 51.852,114.027 52.45,114.625 C10.2 ; v1@51.475,97.325 51.475,96.1 U1.13 ; C10.2@52.45,114.375 C10.2@52.5,114.375
  Top Layer w0.508: v1(36.75,84.25) TP3.1 ; C22.1 38.05,92.025 39.7,92.025 39.744,92.069 40.468,92.069 40.474,92.075 v1(41.8,92.075) ; v1@38.685,125.271 39.604,125.271 C19.2 39.765,125.14 42.184,125.14 U5.5 ; C13.2 C14.2 ; v1(42.1,87.5) 43.956,87.5 44.562,86.894 46.744,86.894 47.5,87.65 R9.2 ; C8.2@42.425,118.125 C8.2@42.5,118.2 ; C8.2@42.425,118.175 C8.2 ; C7.2 C9.2 ; v1@51.525,97.375 52.75,97.375 C18.1 ; v1(56.25,99.75) 56.312,99.813 57.687,99.813 C3.2 57.8,99.875 58.154,99.521 59.229,99.521 U4.1 59.371,99.379 59.799,99.379 60.206,98.972 60.206,98.028 59.997,97.819 59.794,97.819 59.525,97.55 U4.3 ; v1(57.2,112.2) 63.025,112.2 63.125,112.3 ; R2.2 62.5,87.65 62.6,87.75 v1(63.75,87.75) 64.975,86.525 64.975,84.025 66.2,82.8 R6.2 ; J1.1 63.056,123.694 63.081,123.694 63.666,123.109 63.666,117.15 63.125,116.609 63.125,112.3 ; U3.5 63.111,109.061 C4.2@63.111,110.614 ; C4.2 63.125,112.3
  Bottom Layer w0.508: v1(36.75,84.25) 40.5,84.25 42.1,85.85 v1(42.1,87.5) 42.984,88.384 42.984,92.4 ; v1(38.25,125.5) 37.234,124.484 37.234,121.966 ; v1@39.7,101.1 39.853,101.1 40.803,102.05 ; v1@41.9,92.3 42,92.4 42.984,92.4 ; v1(51.45,97.35) 51.45,99.4 50.25,100.6 42.253,100.6 ; v1(57.2,112.2) 57.1,112.2 54.025,109.125 ; v1(63.75,87.75) 63.75,89.813 56.734,96.829 56.734,99.266 v1(56.25,99.75) 55.063,99.75 54.1,100.713 54.1,109.05 54.025,109.125 ; 37.234,121.966 46,113.2 v1(46,112.8) 46.9,111.9 v1(48.7,111.9) 51.475,109.125 54.025,109.125 ; 37.234,121.966 33.3,118.032 33.3,107 36.8,103.5 39.353,103.5 40.803,102.05 ; 40.803,102.05 42.253,100.6 ; 42.253,100.6 42.984,99.869 42.984,92.4
5V: C2.2 C20.2 D1.5 D5.1 J2.A4-B9 J2.B4-A9 TP1.1 U3.1 U3.3 U5.3 | length 121.9
  Top Layer w0.305: D1.5 54.502,103.857 55.006,103.857 55.359,103.503 v1(55.359,102.109)
  Top Layer w0.508: v1(36.75,80.75) TP1.1 ; v1(45.7,123.949) 45.745,123.904 47.282,123.904 U5.3 50.71,123.885 50.95,124.125 C20.2 ; C2.2 59.321,109.071 60.671,109.071 U3.1 60.792,108.95 61.195,108.95 61.552,108.593 61.552,107.599 61.195,107.242 60.792,107.242 U3.3 60.846,107.146 62.242,105.75 v1(64.5,105.75) 64.604,105.646 66.204,105.646 J2.B4-A9 ; v1@64.906,100.8 J2.A4-B9 ; D5.1 v1(66.25,96.75)
  Bottom Layer w0.508: v1(36.75,80.75) 37.2,80.3 63.05,80.3 66.25,83.5 v1(66.25,96.75) 66.044,96.75 65.18,97.614 64.199,97.614 63.484,98.329 63.484,99.984 v1(64.5,101) 64.5,102.25 ; v1(45.7,123.949) 45.7,121.8 47.581,119.919 60.799,119.919 63.484,117.234 63.484,106.766 v1(64.5,105.75) 64.5,102.25 ; v1(55.359,102.109) 64.359,102.109 64.5,102.25
BTN_1: C6.2 R2.1 R3.2 U2.28 | length 40.4
  Top Layer w0.254: v1(48.9,110.1) 48.998,110.002 50.773,110.002 U2.28 ; C6.2 54.3,82.125 55.071,82.896 55.071,87.671 56.1,88.7 58.25,88.7 ; v1(57.7,89.8) 57.7,89.525 58.25,88.975 58.25,88.7 ; R2.1 59.1,87.75 R3.2 59.05,87.9 58.25,88.7
  Bottom Layer w0.254: v1(48.9,110.1) 48.9,108.9 51.5,106.3 51.5,101.8 54.411,98.889 55.311,98.889 56.2,98 56.2,96 57.7,94.5 v1(57.7,89.8)
CAN_H: J3.3 J3.4 U5.7 | length 66.6
  Top Layer w0.203: U5.7 42.888,122.615 43.139,122.866 43.139,122.928 43.258,123.047 43.595,123.047 44.836,124.288 44.836,124.307 46.192,125.662 64.838,125.662 72.108,118.392 72.108,108.304 72.457,107.956 72.457,107.084 72.108,106.736 72.108,99.664 72.457,99.316 72.457,98.444 71.841,97.828 71.474,97.828 70.56,96.915 70.56,94.459 70.662,94.358 70.662,93.319 69.996,92.652 69.827,92.652 69.708,92.771 69.708,93.542 J3.3
  Bottom Layer w0.203: J3.3 70.598,92.652 70.902,92.652 J3.4
CAN_L: J3.5 J3.6 U5.6 | length 67.4
  Top Layer w0.203: U5.6 42.888,123.885 43.139,123.634 43.139,123.572 43.258,123.453 43.427,123.453 44.43,124.457 44.43,124.475 46.024,126.069 65.006,126.069 72.515,118.56 72.515,108.472 72.863,108.124 72.863,106.916 72.515,106.568 72.515,99.832 72.863,99.484 72.863,98.276 72.009,97.422 71.643,97.422 70.967,96.746 70.967,93.193 70.122,92.348 69.827,92.348 69.708,92.229 69.708,91.458 J3.5
  Bottom Layer w0.203: J3.5@69.708,91.458 70.598,92.348 70.902,92.348 J3.6
CAN_RX: U2.45 U5.4 | length 18
  Top Layer w0.254: U2.45 45.502,115.277 45.502,117.817 49.185,121.5 51.3,121.5 51.995,122.195 51.995,124.303 51.143,125.155 U5.4
CAN_STB: U2.21 U5.8 | length 16.9
  Top Layer w0.254: v1@42.045,119.6 42.084,119.639 42.084,121.23 U5.8 U5.8@42.172,121.372 ; v1(47.6,113.4) 47.3,113.1 47.3,109.3 48,108.6 U2.21
  Bottom Layer w0.254: v1(42.084,119.6) 42.216,119.468 42.216,118.784 v1(47.6,113.4)
CAN_TX: U2.46 U5.1 | length 7.5
  Top Layer w0.254: U2.46 45,118.9 46.326,120.226 46.326,121.168 46.503,121.345 U5.1
FSYNC: U2.29 U6.6 | length 26.5
  Top Layer w0.254: U6.6@39.9,94.675 40.344,94.675 40.9,95.231 40.9,99.857 42.343,101.3 49.3,101.3 51.8,103.8 51.8,110.125 51.571,110.354 51.567,110.354 51.421,110.5 U2.29 U2.29@50.129,110.5
FSYNC_1V8: U1.11 U6.15 | length 22.1
  Top Layer w0.203: U6.15@45.6,94.675 45.925,94.675 46,94.6 46.083,94.6 47.1,93.583 47.1,91.3 48.9,89.5 54.921,89.5 56,90.579 56,94 54.9,95.1 U1.11
GND: C1.1 C2.1 C3.1 C4.1 C5.1 C6.1 C7.1 C8.1 C9.1 C10.1 C11.1 C12.2 C13.1 C14.1 C15.2 C16.1 C17.2 C18.2 C19.1 C20.1 C21.2 C22.2 D1.2 D2.1 D3.1 J1.3 J1.5 J2.1 J2.2 J2.3 J2.4 J2.A1-B12 J2.B1-A12 J3.7 J3.8 Q1.2 R1.2 R7.1 R8.1 SW1.A1 SW1.A2 SW2.A1 SW2.A2 TP4.1 U1.18 U1.20 U2.8 U2.23 U2.35 U2.47 U3.2 U4.2 U5.2 U6.11 | length 85.8
  Top Layer w0.254: C11.1 40.45,109.125 40.723,109.398 40.723,109.698 41.525,110.5 U2.8 ; C8.1 44.023,117.977 44.023,117.162 44.5,116.685 U2.47 ; U1.20 49.215,95.1 49.484,95.369 49.484,96.059 U1.18@49.5,96.175 ; v1(55.359,105.609) 55.359,104.141 55.641,103.859 D1.2
  Top Layer w0.305: C9.1 49,105.625 U2.23 ; U1.18@49.5,96.175 v1(49.5,97.35) v1@49.685,97.435 ; U2.35 52.075,113.5 C10.1@52.35,113.225
  Top Layer w0.381: SW2.A1@44,85.25 SW2.A1 ; v1(50.6,83.3) 50.6,85 SW2.A2 SW2.A2@51.042,85.442 ; C6.1@54.2,80.875 C6.1
  Top Layer w0.508: D3.1@31.054,96.254 D3.1 v1(31.2,94.7) ; v1(34.4,94.8) 34.425,94.825 34.425,96.396 D2.1 ; D2.1@34.449,96.567 D2.1@34.503,96.567 ; C15.2 v1(36.2,111.8) C12.2 ; v1(36.6,93.4) 36.638,93.363 37.962,93.363 C22.2 ; v1(36.75,86) TP4.1 ; v1(37.75,114.75) 37.812,114.812 39.187,114.812 C13.1 C14.1 ; v1(38.25,124) 38.313,123.937 39.688,123.937 C19.1 C19.1@39.8,123.875 ; v1(39,109) 39.062,109.062 40.338,109.062 C11.1 ; C8.1 43.7,118.3 43.8,118.4 v1(43.8,119.7) ; SW2.A1@44,85.25 v1(47.5,85.25) ; C21.2 v1(46,99.1) ; U6.11@45.5,91.85 45.55,91.8 45.55,90.825 v1(45.6,90.775) ; U5.2 47.32,122.634 49.634,122.634 v1(49.75,122.75) 49.956,122.75 v1@50.185,122.979 ; C7.1 48.75,104 47.6,105.15 v1(47.6,105.4) 48.775,105.4 C9.1 ; v1@49.935,122.729 50.854,122.729 C20.1 ; C17.2 51.125,91 52.4,91 v1(52.5,91.1) ; C10.1 52.612,113.487 53.787,113.487 v1(53.9,113.6) ; R1.2 53,122.35 54.55,123.9 v1(54.6,123.9) ; C18.2 v1(55.2,97.4) ; C6.1@54.2,80.875 54.123,80.952 53.048,80.952 52.75,81.25 v1(52.75,82.75) 52.896,82.896 53.596,82.896 54.2,83.5 C16.1 C16.1@54.396,83.646 ; v1(54.9,90.7) 55,90.8 55,92.075 C1.1 ; SW1.A1 56.3,85.1 v1(56.3,83.4) ; v1(57.75,97.25) C3.1 ; C3.1@57.896,98.729 58.846,98.729 59.075,98.5 U4.2 ; v1(58.75,101) C5.1 ; v1(59.25,106.5) 59.273,106.523 59.273,107.823 C2.1 59.346,107.846 59.5,108 60.6,108 U3.2 ; v1(59.75,85.25) SW1.A2 ; v1(60.3,110.6) C4.1 ; v1(61.9,95.5) 61.925,95.475 61.925,93.925 Q1.2 ; v1(64.75,99) 64.75,99.5 65.207,99.957 66.207,99.957 J2.A1-B12 ; v1(64.75,108.5) 64.75,107 65.35,106.4 J2.B1-A12 ; R8.1 68.75,110.75 v1@69.9,111.9 ; v1(69.9,112) v1@69.9,111.9 ; R7.1 71.05,110.75 v1@69.9,111.9
  other v1: 30,85 67.5,90 60,95 44.5,103.1 30,105 60,105 57.5,110 30,115 55,115 60,115 65,115 70,115 32.5,120 37.5,120 67.5,120 72.5,120
INT_1: U2.30 U6.7 | length 27.5
  Top Layer w0.203: U6.7@39.9,94.025 40.3,94.025 40.547,94.272 40.555,94.272 41.4,95.117 41.4,99.6 42.6,100.8 49.7,100.8 52.3,103.4 52.3,110.125 51.425,111 U2.30
INT_1_1V8: U1.12 U6.14 | length 23.5
  Top Layer w0.203: U6.14@45.6,94.025 46,94.025 46.247,93.778 46.255,93.778 46.6,93.433 46.6,91.2 48.8,89 55,89 56.4,90.4 56.4,94.3 55.2,95.5 U1.12
LED_0: R4.2 U2.12 | length 11.8
  Top Layer w0.254: R4.2 36.2,101.7 40.4,105.9 41.7,105.9 42.725,106.925 U2.12
LED_1: R5.2 U2.11 | length 14.6
  Top Layer w0.254: R5.2 33.15,100.15 39.5,106.5 41.2,106.5 41.721,107.021 41.721,108.646 41.929,108.854 41.933,108.854 42.079,109 U2.11
MISO: U2.16 U6.4 | length 19.3
  Top Layer w0.254: U6.4 38.7,95.875 37.7,96.875 37.7,101.475 39.1,102.875 40.4,104.175 v1(42.3,104.175) ; U2.16 45.502,107.223 45.502,104.198 v1(45.6,104.1)
  Bottom Layer w0.254: v1@42.4,104.4 42.55,104.25 45.45,104.25 v1(45.6,104.1)
MISO_1V8: U1.9 U6.17 | length 18.2
  Top Layer w0.203: U6.17@45.6,95.975 46.514,95.975 46.7,95.789 46.7,94.478 47.636,93.542 47.636,91.364 49,90 52.8,90 53.8,91 53.8,93.6 53.1,94.3 52.505,94.3 U1.9 52.077,94.298 52.505,94.298
MOSI: U2.17 U6.3 | length 19.6
  Top Layer w0.254: U6.3 38.75,96.525 38.2,97.075 38.2,100.975 40.025,102.8 v1(41.5,102.8) ; v1(45.9,102.2) 46.489,102.789 46.489,105.4 46,105.889 U2.17
  Bottom Layer w0.254: v1@41.8,103 42.6,102.2 v1(45.9,102.2)
MOSI_1V8: U1.24 U6.18 | length 5.3
  Top Layer w0.203: U6.18@45.6,96.625 46.514,96.625 47.2,95.939 47.2,94.715 48.415,93.5 U1.24
NetC1_2: C1.2 U1.10 | length 3.6
  Top Layer w0.203: U1.10@52.077,94.698 U1.10 53.775,94.7 55.05,93.425 C1.2
NetD2_2: D2.2 R4.1 | length 4.2
  Top Layer w0.254: R4.1@34.7,100.05 35.949,98.801 D2.2 ; R4.1@34.9,100.05 R4.1@34.9,100.15
NetD3_2: D3.2 R5.1 | length 4.4
  Top Layer w0.254: R5.1 31.2,97.9 D3.2
NetD4_1: D4.1 Q1.3 | length 7
  Top Layer w0.254: Q1.3 62.9,91.85 64.111,90.639 64.111,88.639 64.118,88.639 64.639,88.118 64.639,88.111 D4.1
NetD4_2: D4.2 R6.1 | length 4.2
  Top Layer w0.254: R6.1 66.4,81.3 67.029,81.929 67.029,83.295 66.673,83.65 66.673,84.577 D4.2
NetD5_2: D5.2 J3.1 J3.2 | length 8.6
  Top Layer w0.508: D5.2 66.26,91.56 66.26,93.09 J3.1
  Bottom Layer w0.508: J3.1 J3.2
NetJ2_A5: J2.A5 R7.2 | length 9.9
  Top Layer w0.305: J2.A5 66.252,101.952 66.852,101.952 69.3,104.4 69.3,107.774 70.776,109.25 R7.2
NetJ2_B5: J2.B5 R8.2 | length 5.9
  Top Layer w0.305: J2.B5 66.252,104.952 67.216,104.952 68.55,106.286 68.55,109.25 R8.2
NetR1_1: R1.1 U2.44 | length 10.5
  Top Layer w0.254: U2.44 46,117.4 49.45,120.85 R1.1
NetR3_1: R3.1 SW1.B1 SW1.B2 | length 14.5
  Top Layer w0.254: SW1.B1 SW1.B1@56.3,81.25 ; R3.1 58.4,86.95 58.4,83.5 56.873,81.973 56.873,81.823 SW1.B1@56.3,81.25 ; SW1.B2 SW1.B1@56.3,81.25
NetR10_1: R10.1 SW2.B1 SW2.B2 | length 14.4
  Top Layer w0.254: SW2.B1 44.2,81.2 50.75,81.2 SW2.B2@50.7,81.25 ; R10.1 48.8,87.05 48.8,83.3 50.127,81.973 50.127,81.823 SW2.B2@50.7,81.25 ; SW2.B2 SW2.B2@50.7,81.25
NSS/CS0: U2.14 U6.5 | length 18.3
  Top Layer w0.254: U6.5 38.475,95.225 37.2,96.5 37.2,101.8 40.689,105.289 43.214,105.289 44.354,106.429 44.354,106.433 44.5,106.579 U2.14
NSS/CS0_1V8: U1.22 U6.16 | length 10.1
  Top Layer w0.203: v1(44,95.4) 44.087,95.313 45.363,95.313 U6.16 ; v1(47.4,97.9) 48.1,97.2 48.1,94.871 48.574,94.397 48.606,94.397 48.703,94.3 U1.22
  Bottom Layer w0.203: v1@44.1,95.8 46.2,97.9 v1(47.4,97.9)
OSC_IN: C12.1 R11.2 U2.5 X1.2 | length 12.5
  Top Layer w0.254: X1.2 32.9,115.3 33.5,115.9 34.625,115.9 C12.1 36.25,114.325 38.425,112.15 R11.2 39.75,112 U2.5
OSC_OUT: C15.1 R11.1 U2.6 X1.1 | length 11.4
  Top Layer w0.254: X1.1 34.525,107.65 36.15,109.275 C15.1 36.25,109.275 37.625,110.65 R11.1 39.7,110.65 40.55,111.5 U2.6
P_USB_D_M: D1.6 U2.32 | length 10.5
  Top Layer w0.203: U2.32@51.337,112.046 51.555,111.828 51.561,111.828 52.794,110.596 52.794,104.296 53.433,103.656 53.77,103.656 53.92,103.506 54.007,103.506 54.154,103.359 D1.6
P_USB_D_P: D1.4 U2.33 | length 10.3
  Top Layer w0.203: U2.33@51.505,112.453 51.723,112.235 51.729,112.235 53.2,110.764 53.2,104.464 53.602,104.062 53.77,104.062 53.92,104.212 54.007,104.212 54.154,104.359 D1.4
SCK: U2.15 U6.1 | length 11.4
  Top Layer w0.305: U6.1@39.9,97.925 39.9,99.882 45,104.982 U2.15
SCK_1V8: U1.23 U6.20 | length 5.9
  Top Layer w0.203: U6.20@45.6,97.925 45.698,97.827 46.173,97.827 47.6,96.4 47.6,94.8 48.5,93.9 U1.23
STM_NRST: C16.2 R9.1 R10.2 U2.7 | length 57.8
  Top Layer w0.254: v1(37.1,105.8) 37.1,105.7 34.8,103.4 31.5,103.4 29.9,101.8 29.9,92.7 34.111,88.489 44.121,88.489 44.487,88.123 45.727,88.123 R9.1@46,87.85 ; U2.7 42.727,111.002 44.402,111.002 v1(44.5,111.1) ; R9.1 R9.1@46,87.85 ; C16.2 53.977,85.023 53.627,85.023 51,87.65 R10.2 51,87.85 50.371,88.479 46.629,88.479 R9.1@46,87.85
  Bottom Layer w0.254: v1(37.1,105.8) 39.2,105.8 v1(44.5,111.1)
SWCLK: J1.4 U2.37 | length 17.5
  Top Layer w0.254: U2.37 49.5,117.7 50.3,118.5 59,118.5 61.48,120.98 J1.4
SWDIO: J1.2 U2.34 | length 17.3
  Top Layer w0.254: U2.34 51.421,113 51.567,112.854 51.571,112.854 51.738,112.687 54.437,112.687 62.75,121 J1.2
SWO: J1.6 U2.39 | length 17.2
  Top Layer w0.254: U2.39 48.5,117.5 50.1,119.1 58.5,119.1 60.21,120.81 J1.6
SWRST: J1.10 U2.40 | length 14.9
  Top Layer w0.254: U2.40 48,117.9 49.9,119.8 55.8,119.8 57.67,121.67 J1.10
USB_D_M: D1.1 J2.A7 J2.B7 | length 12
  Top Layer w0.203: D1.1 56.454,103.359 56.601,103.506 56.688,103.506 56.838,103.656 60.894,103.656 61.054,103.497 65.5,103.497 ; J2.B7 65.738,102.45 65.472,102.716 65.472,103.469 65.5,103.497 ; J2.A7 66.203,103.497 65.5,103.497
USB_D_P: D1.3 J2.A6 J2.B6 | length 12.6
  Top Layer w0.203: D1.3 56.454,104.359 56.601,104.212 56.688,104.212 56.838,104.062 61.063,104.062 61.222,103.903 66.203,103.903 J2.B6 66.762,103.95 67.028,103.684 67.028,103.216 66.781,102.969 66.752,102.998 66.298,102.998 J2.A6
pads on no net: J1.7 J1.8 J1.9 J2. J2.A8 J2.B8 MP1. MP2. MP3. MP4. U1.1 U1.2 U1.3 U1.4 U1.5 U1.6 U1.7 U1.14 U1.15 U1.16 U1.17 U1.19 U1.21 U1.25 U2.2 U2.3 U2.4 U2.10 U2.13 U2.18 U2.19 U2.20 U2.22 U2.25 U2.26 U2.27 U2.31 U2.38 U2.41 U2.42 U2.43 U3.4 U4.4 U6.8 U6.9 U6.12 U6.13

## Polygon pours and split planes (outlines as drawn)
GND on GND1 (split plane): 73.89,79.51 29.26,79.51 29.26,126.49 73.89,126.49
GND on GND2 (split plane): 73.89,79.51 29.26,79.51 29.26,126.49 73.89,126.49

## Silkscreen, mask and mechanical layers (free items; w line width, h text height)
Top Overlay:
  text "CAN/USB IMU  / DEV BRD / katielin42" at 55.4,112.9 h1.3